# Altium PCB Drain_board.PcbDoc
Units mm, origin at the board's own origin, x right, y up, seen from the top; angles counter-clockwise.
Board outline 35.5 x 49.5 mm, 2 copper layers (Top Layer, Bottom Layer); 20 components, 16 nets, 122 pads, 32 vias.
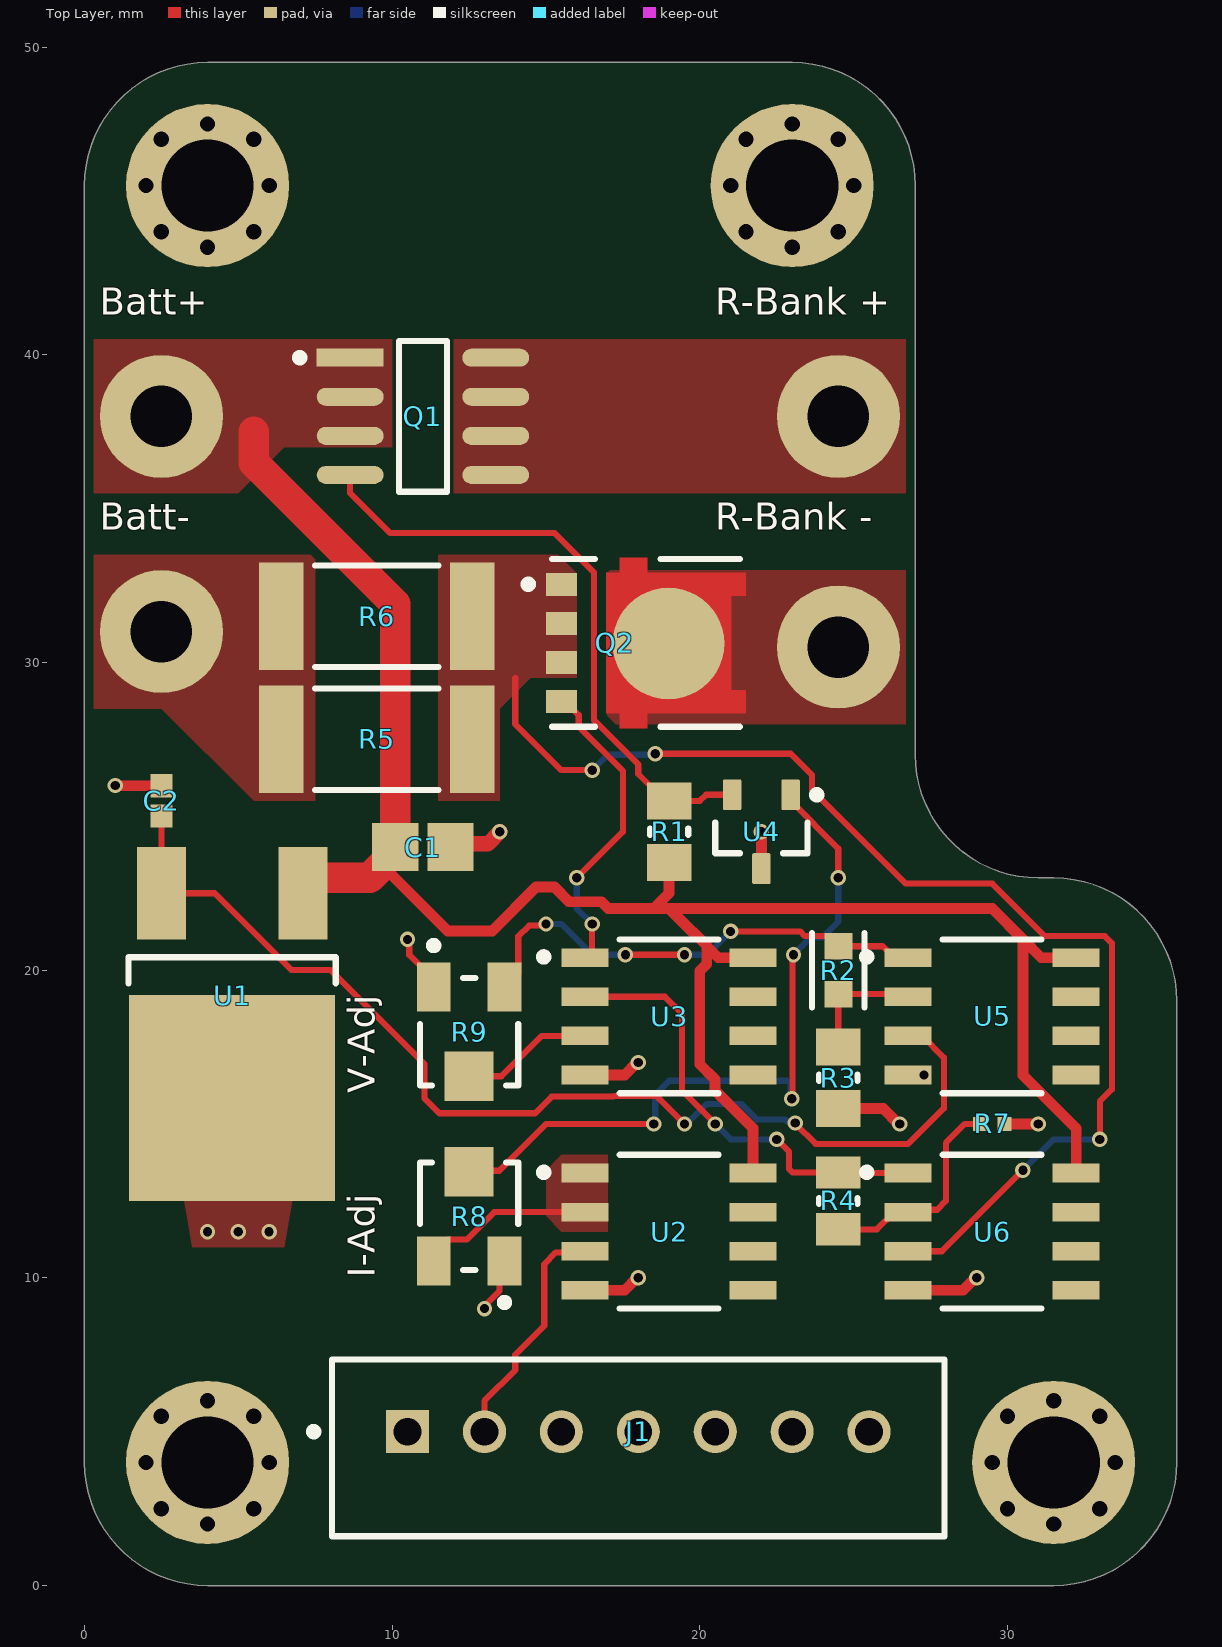
[diagram p0: Top Layer view]
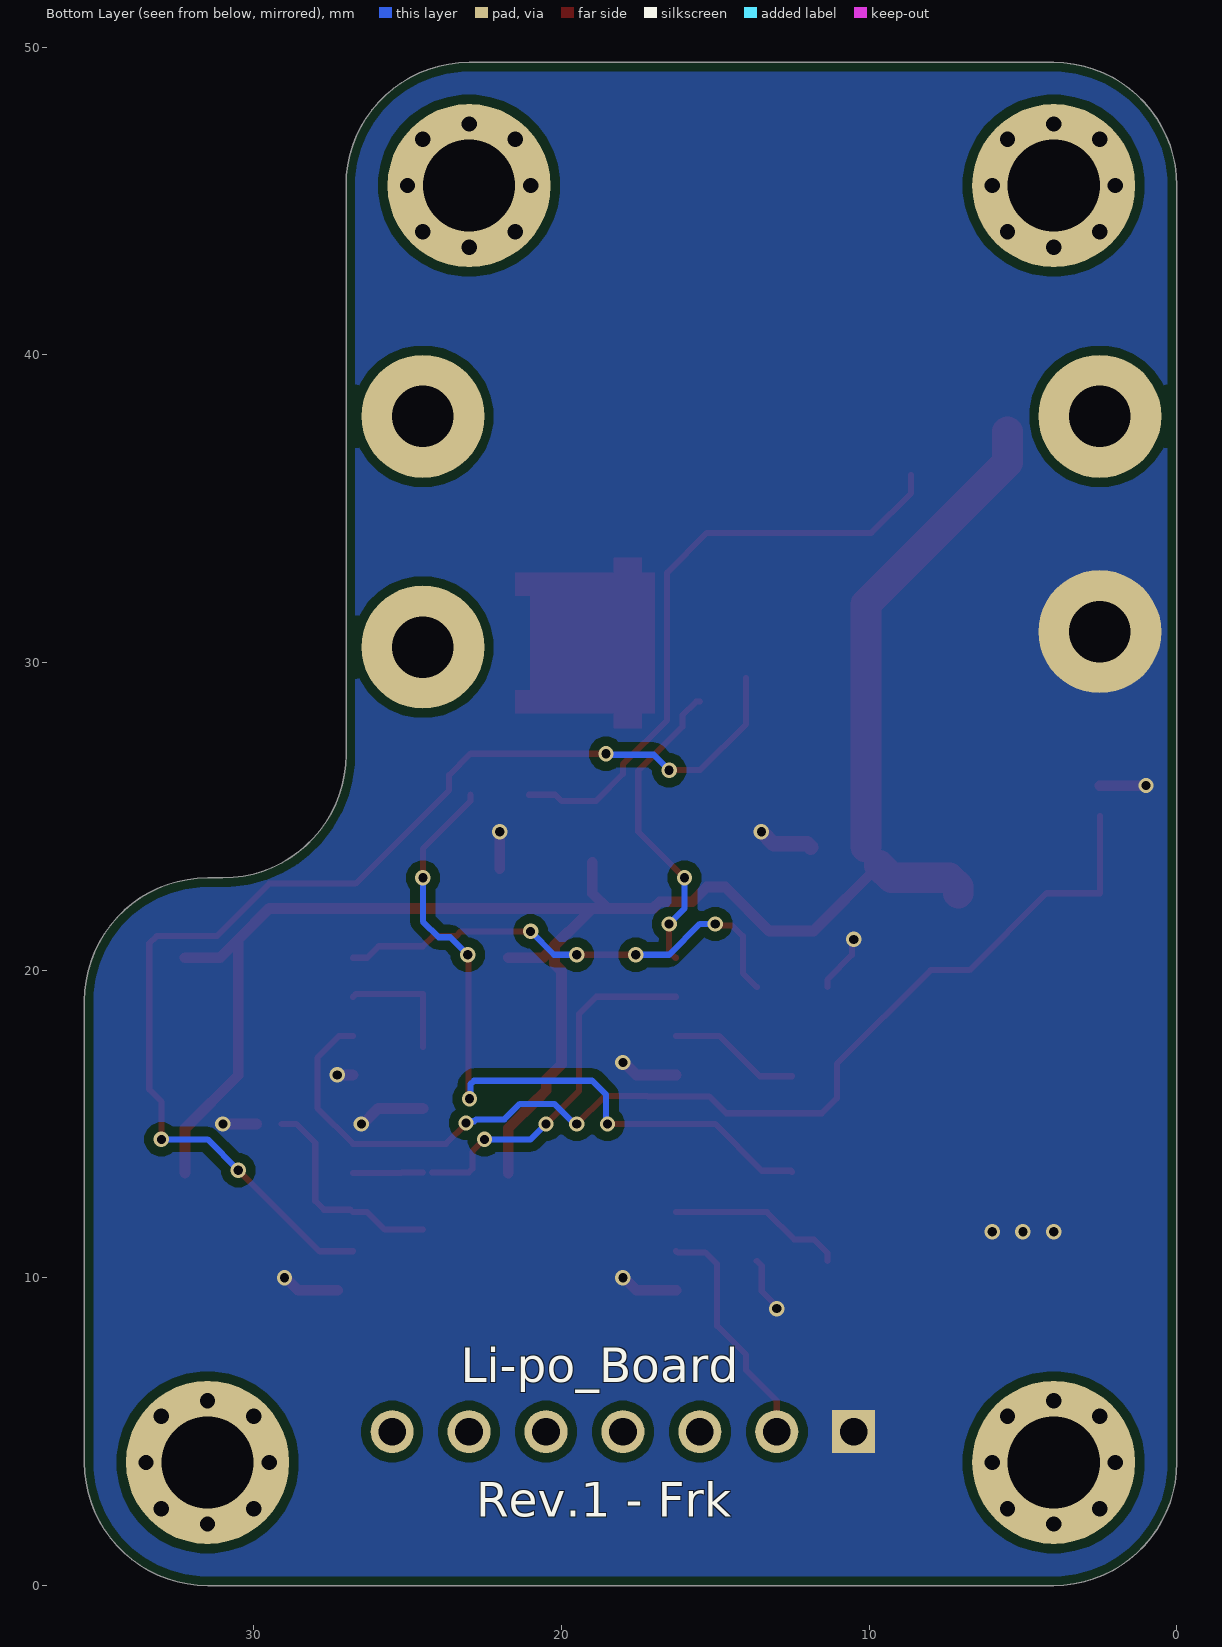
[diagram p1: Bottom Layer view, seen from below]
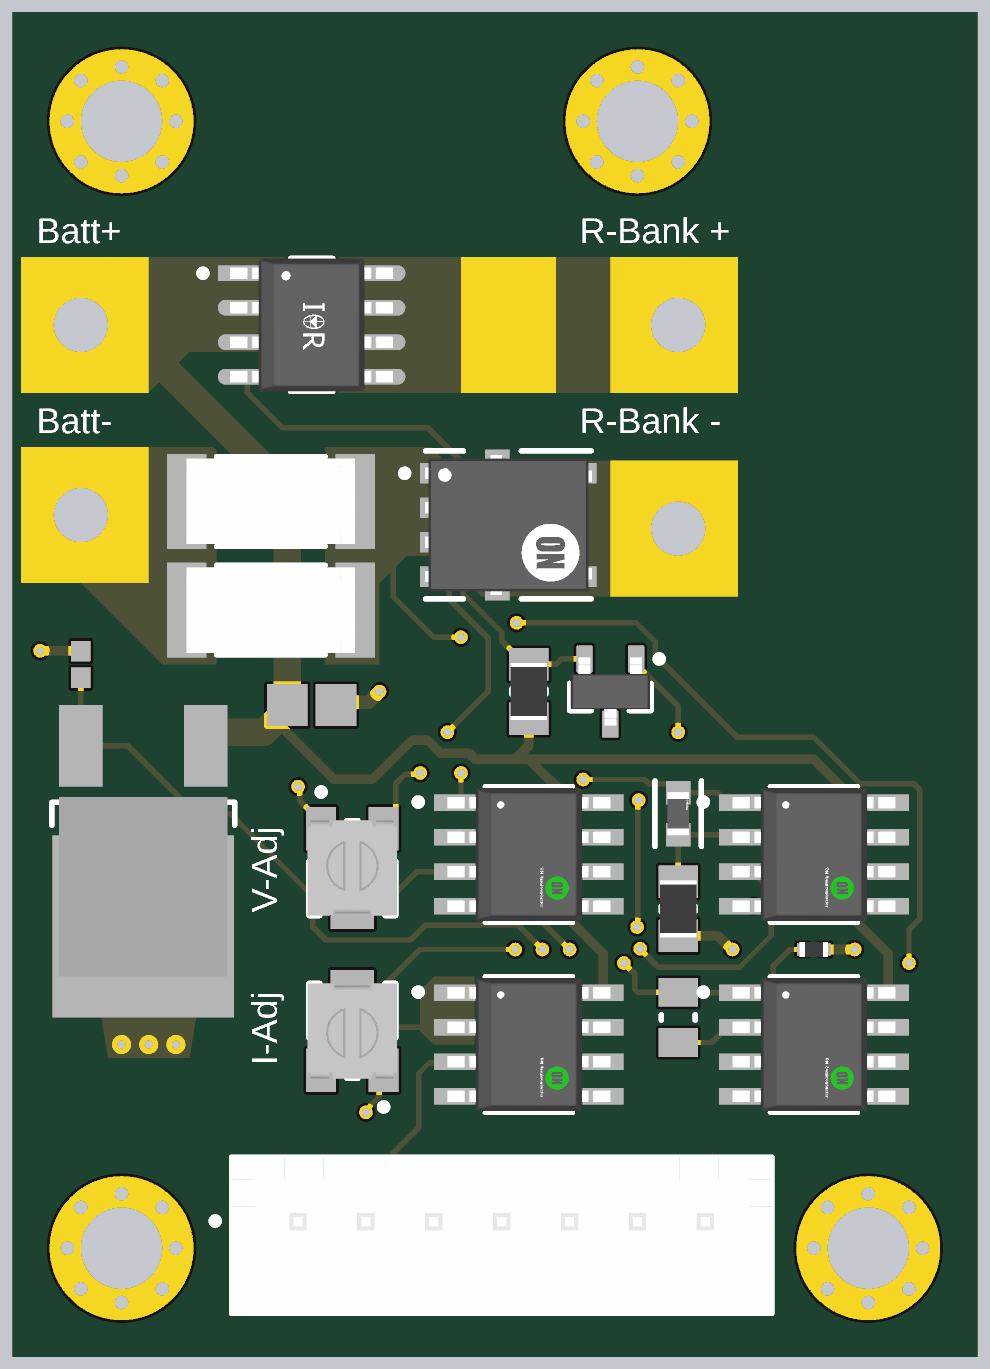
[diagram p2: 3D render of the assembled board from above, using the file's embedded part models]

## Layer stack, top to bottom
Top Solder: solder mask 0.0102, Solder Resist, Dk 3.5
Top Layer: signal copper 0.035
Dielectric 1: dielectric 0.32, FR-4, Dk 4.8
Bottom Layer: signal copper 0.035
Bottom Solder: solder mask 0.0102, Solder Resist, Dk 3.5

## Board outline
0,4 0,45.5 cw(c4,45.5) 4,49.5 23,49.5 cw(c23,45.5) 27,45.5 27,27 ccw(c31,27) 31,23 31.5,23 cw(c31.5,19) 35.5,19 35.5,4 cw(c31.5,4) 31.5,0 4,0 cw(c4,4)

## Design rules (kind name [scope] priority, off if disabled: settings)
BoardOutlineClearance [All] p1: gap=0.3 ignorepadtopadclearanceinfootprint=FALSE
Clearance [All] p1: gap=0.3 ignorepadtopadclearanceinfootprint=TRUE
HoleSize [All] p1: absolutevalues=TRUE maxlimit=6.2 minlimit=0.15 maxpercent=80.000 minpercent=20.000
PlaneConnect [All] p1: planeconnectstyle=Direct reliefexpansion=0.508 reliefentries=4 reliefconductorwidth=0.254 reliefairgap=0.254
PolygonConnect [All] p1: connectstyle=Direct reliefconductorwidth=0.254 reliefentries=4 polygonreliefangle="90 Angle" airgapwidth=0.254
RoutingVias [All] p1: holewidth=0.3 width=0.5 viastyle="Through Hole" minholewidth=0.3 minwidth=0.5 maxholewidth=1 maxwidth=2
SolderMaskExpansion [All] p1: expansion=0.102 istentingtop=FALSE
SupplyNets "Schematic Supply Nets_2" [InNet('GND')] p1: voltage=0.000
SupplyNets "Schematic Supply Nets_1" [InNet('+5')] p2: voltage=0.000
SupplyNets "Schematic Supply Nets" [InNet('VCC')] p3: voltage=0.000
Width [All] p1: maxlimit=1 minlimit=0.2 preferedwidth=0.35
28 further rules are at their usual default settings.

## Components (designator, comment, footprint, x,y, rotation, side; value= is the part's Value field where it differs from the comment)
C1 "C0805C225K9PACTU" CAPC2013X145X50ML20T25 11,24 r180 top
C2 "CL05B104KO5NNNC" CAPC1050X55X23ML05T13 2.5,25.5 r270 top
J1 "B7B-XH-A(LF)(SN)" FP-B7B-XH-A_LF_SN-MFG 18,4.475 r180 top
Q1 "IRF7416TRPBF" FP-PG-DSO-8-IPC_B 11,38 r0 top
Q2 "NTMFS5C430NT1G" FP-488AA-MFG 18.247,30.635 r270 top
R1 "RC0805FR-071KL" RESC2013X60X35ML10T20 19,24.5 r270 top
R2 "AC0603FR-071KL" FP-AC0603-IPC_B 24.5,20 r90 top
R3 "RC0805FR-071KL" RESC2013X60X35ML10T20 24.5,16.5 r90 top
R4 "12k Ohm 0805" RESC2013X50X30NL20T20 24.5,12.5 r270 top
R5 "0.03ohm - 2512" FP-CRCW2512-e3-MFG 9.5,27.5 r0 top
R6 "0.03ohm - 2512" FP-CRCW2512-e3-MFG 9.5,31.5 r0 top
R7 "82 ohm" RESC1005X40X25LL05T05 29.5,15 r180 top
R8 "3313J-1-203E" BOUR-3313J-1_V 12.5,12 r90 top
R9 "3313J-1-203E" BOUR-3313J-1_V 12.5,18 r270 top
U1 "L78M05ABDT-TR" FP-L78M05ABDT-TR-MFG 4.8,17.307 r180 top
U2 "NCS20072DR2G" FP-751-07-MFG 19,11.5 r0 top
U3 "NCS20072DR2G" FP-751-07-MFG 19,18.5 r0 top
U4 "TL432BQDBZR" DBZ0003A_N 22,24.5 r270 top
U5 "NCS20072DR2G" FP-751-07-MFG 29.5,18.5 r0 top
U6 "NCS20072DR2G" FP-751-07-MFG 29.5,11.5 r0 top

## Footprints (in the part's own frame and the unit in brackets; to place one, negate y for a bottom-side part, rotate by r counter-clockwise, add the part's x,y. Pads: shape width x height; smd on the part's side, far side on the other; paste and mask are expansions set on the pad)
BOUR-3313J-1_V [mm] "SMD, 3-Leads, Body 3.5x3.2mm, Pitch 1.15mm"
  rect 1.6x1.1 smd paste+0: 1(-1.45,-1.15) 3(-1.45,1.15)
  rect 1.6x1.6 smd paste+0: 2(1.45,0)
  silkscreen extent -2.92,-1.6 1.75,1.6, body extent -1.75,-1.65 1.75,1.65, height 2.11
CAPC1050X55X23ML05T13 [mm] "Chip Capacitor, 2-Leads, Body 1.05x0.55mm, IPC Low Density"
  rect 0.76x0.72 smd: 1(-0.49,0) 2(0.49,0)
  body extent -0.53,-0.28 0.53,0.27, height 0.55
CAPC2013X145X50ML20T25 [mm] "Chip Capacitor, 2-Leads, Body 2.00x1.25mm, IPC Low Density"
  rect 1.5x1.55 smd: 1(-0.9,0) 2(0.9,0)
  body extent -1.1,-0.72 1.1,0.72, height 1.45
DBZ0003A_N [mm] "SOT23, 3-Leads, Body 3.04x1.4mm, Pitch 0.95mm, IPC Medium Density"
  rrect17% 1x0.6 smd: 1(-1.2,0.95) 2(-1.2,-0.95) 3(1.2,0)
  silkscreen extent -1.32,-1.5 0.7,1.93, body extent -1.26,-1.46 1.26,1.46, height 0.96
FP-488AA-MFG [mm]
  rect 0.75x1 smd paste+0 mask+0: 1(-1.905,-2.748) 2(-0.635,-2.748) 3(0.635,-2.748) 4(1.905,-2.748)
  round 3.631 smd paste+0 mask+0: 5-6(0.021,0.735)
  Top Layer region: -2.28,-1.282 -2.28,-0.857 -2.775,-0.857 -2.775,0.048 -2.28,0.048 -2.28,3.247 -1.53,3.247 -1.53,2.772 1.53,2.772 1.53,3.247 2.28,3.247 2.28,0.048 2.775,0.048 2.775,-0.857 2.28,-0.857 2.28,-1.282
  silkscreen extent -2.73,-3.95 2.73,3.05, body extent -2.88,-3.35 2.88,3.35, height 0.25
FP-751-07-MFG [mil]
  rect 60x24 smd paste+0 mask+0: 1(-107.5,75) 2(-107.5,25) 3(-107.5,-25) 4(-107.5,-75) 5(107.5,-75) 6(107.5,-25) 7(107.5,25) 8(107.5,75)
  silkscreen extent -165,-98 63,98, body extent -141,-108 141,108, height 10
FP-AC0603-IPC_B [mm]
  rect 0.859x0.912 smd paste+0 mask+0: 1(-0.777,0) 2(0.777,0)
  silkscreen extent -1.21,-0.86 1.21,0.86, body extent -1.46,-0.71 1.46,0.71, height 0.25
FP-B7B-XH-A_LF_SN-MFG [mm]
  rect 1.4x1.4 hole 0.9 paste-2539.97 mask+0: 1(7.5,-0.525)
  round 1.4 hole 0.9 paste-2539.97 mask+0: 2(5,-0.525) 3(2.5,-0.525) 4(0,-0.525) 5(-2.5,-0.525) 6(-5,-0.525) 7(-7.5,-0.525)
  silkscreen extent -9.95,-2.88 10.67,2.88, body extent -10.05,-2.98 10.05,2.98, height 0.25
FP-CRCW2512-e3-MFG [mm]
  rect 1.45x3.5 smd paste+0 mask+0: 1(-3.1,0) 2(3.1,0)
  silkscreen extent -2,-1.65 2,1.65, body extent -3.93,-1.85 3.93,1.85, height 0.25
FP-L78M05ABDT-TR-MFG [mm]
  rect 1.6x3 smd paste+0 mask+0: 1(-2.3,-5.193) 3(2.3,-5.193)
  rect 6.7x6.7 smd paste+0 mask+0: 4(0,1.458)
  silkscreen extent -3.36,-3.11 3.36,-2.27, body extent -3.46,-6.79 3.46,4.91, height 0.25
FP-PG-DSO-8-IPC_B [mm]
  rect 2.174x0.583 smd paste+0 mask+0: 1(-2.366,1.905)
  rrect100% 2.174x0.583 smd paste+0 mask+0: 2(-2.366,0.635) 3(-2.366,-0.635) 4(-2.366,-1.905) 5(2.366,-1.905) 6(2.366,-0.635) 7(2.366,0.635) 8(2.366,1.905)
  silkscreen extent -4.13,-2.45 0.78,2.45, body extent -3.7,-2.7 3.7,2.7, height 0.25
RESC1005X40X25LL05T05 [mm] "Chip Resistor, 2-Leads, Body 1.05x0.55mm, IPC High Density"
  rect 0.45x0.45 smd: 1(-0.4,0) 2(0.4,0)
  body extent -0.53,-0.28 0.53,0.28, height 0.4
RESC2013X50X30NL20T20 [mm] "Chip Resistor, 2-Leads, Body 2.00x1.25mm, IPC Medium Density"
  rect 1.05x1.45 smd: 1(-0.925,0) 2(0.925,0)
  silkscreen extent -0.1,-0.63 0.1,0.63, body extent -1.1,-0.72 1.1,0.72, height 0.5
RESC2013X60X35ML10T20 [mm] "Chip Resistor, 2-Leads, Body 2.1x1.35mm, IPC Low Density"
  rect 1.2x1.45 smd: 1(-1,0) 2(1,0)
  silkscreen extent -0.1,-0.63 0.1,0.63, body extent -1.05,-0.68 1.05,0.67, height 0.6

## Part data
C1: library part CMP-1036-04819-2, Manufacturer=Kemet, Part Number=C0805C225K9PACTU
C2: library part CMP-2000-05439-1, "Chip Capacitor, 100 nF, +/- 10%, 16 V, -55 to 125 degC, 0402 (1005 Metric), RoHS, Tape and Reel", Capacitance=100000pF, Case Size/Dimension=0402, Dielectric=X7R, Manufacturer="Samsung Electro-Mechanics", Rated Voltage=16V, Tolerance (%)=±10%, Datasheet URL=https://datasheet.ciiva.com/29198/458718-da-01-en-vs-kondensator-0402-29198423.pdf, Datasheet Version=Nov-10, Manufacturer URL=http://www.samsungsem.com/global/index.jsp
J1: library part CMP-17439-000323-2, "CONN HEADER VERT 7POS 2.5MM", Color=Natural, Contact Resistance=20mR, Current Rating=3A, Flammability Rating="UL94 V-0", Housing Color=White, Insulation Resistance=1GR, Max Operating Temperature=85°C, Max Voltage Rating (AC)=250V, Min Operating Temperature=-25°C, Connector Type=Header, Contact Finish - Mating=TIN, Contact Material=Brass, Contact Plating=Tin, Contact Shape=Square, Contact Type="Male Pin", Depth=5.75mm, Fastening Type=Detent, Housing Material=Polyamide, Insulation Color=Natural, Insulation Material=Nylon, Lead Free="Lead Free", Lead Pitch=2.5mm, Length=19.9mm, Mated Stacking Heights=9.8mm, Max Current Rating=3A, Mount="Through Hole", Number of Contacts=7, Number of Positions=7, Number of Rows=1, Orientation=Straight, Packaging=Bulk, Pitch=2.5mm, REACH SVHC="No SVHC", Series=XH, Termination=Solder, Voltage Rating=250V, Voltage Rating (AC)=250V, Wire/Cable Gauge=22AWG
Q1: library part CMP-32901-000322-1, "MOSFET P-CH 30V 10A 8-SOIC", Case/Package=SO, Continuous Drain Current (ID)=10A, Drain to Source Breakdown Voltage=-30V, Drain to Source Resistance=35mR, Gate to Source Voltage (Vgs)=20V, Input Capacitance=1.7nF, Max Operating Temperature=150°C, Max Power Dissipation=2.5W, Min Operating Temperature=-55°C, Threshold Voltage=-20V, Contact Plating=Tin, Drain to Source Voltage (Vdss)=-30V, Halogen Free="Halogen Free", Height=0.059inch, Lead Free="Lead Free", Length=0.196inch, Max Dual Supply Voltage=-30V, Mount="Surface Mount", Number of Pins=8, Packaging="Tape and Reel", Power Dissipation=2.5W, Rds On Max=20mR, REACH SVHC="No SVHC", Rise Time=49ns, RoHS Compliant=Yes, Turn-Off Delay Time=59ns, Turn-On Delay Time=18ns, Width=0.157inch
Q2: library part CMP-00278-75099839-1, "NTMFS5C430NT1G T6-D3F 40V Nfet/Reel Rohs Compliant: Yes", Drain to Source Resistance=1.4mΩ, Manufacturer Lifecycle Status=ACTIVE, Lead Free="Lead Free", Lifecycle Status=Production, NexarPartId=75099839, RoHS=Compliant, Schedule B="8541290080, 8541290080"
R1 R3: library part CMP-2100-03671-1, "Chip Resistor, 1 KOhm, +/- 1%, 125 mW, -55 to 155 degC, 0805 (2012 Metric), RoHS, Tape and Reel", Case Code (Imperial)=0805, Case Code (Metric)=2012, Manufacturer=Yageo, Max Operating Temperature=155degC, Max Power Dissipation=125mW, Min Operating Temperature=-55degC, Package Description="2-Pin Surface Mounted Device, Body 2 x 1.25 mm", Package Quantity=1, Resistance=1KOhm, Temperature Coefficient=100ppm/degreesC, Tolerance=1%, Voltage Rating=150V, Case/Package=0805, Composition=ThickFilm, Datasheet URL=http://www.yageo.com/NewPortal/yageodocoutput?fileName=/pdf/R-Chip/PYu-RC_Group_51_RoHS_L_5.pdf, Datasheet Version="Rev. 5, 10/2016", Depth=1.25mm, Height=0.024inch, Lead Free=LeadFree, Length=0.079inch, Manufacturer URL=http://www.yageo.com/, Military Standard=Not, Number of Pins=2, Number of Terminations=2, Package Reference=0805, Packaging=TapeandReel, Power Rating=125mW, REACH SVHC=Unknown, RoHSCompliant=true, Termination=SMD/SMT, Voltage Rating (DC)=150V, Width=0.049inch
R2: library part CMP-2000-04828-3, "RES 1kΩ 1.00% 0.1W 0603", Case Code (Imperial)=0603, Case Code (Metric)=1608, Max Operating Temperature=155°C, Max Power Dissipation=100mW, Min Operating Temperature=-55°C, Package Quantity=1, Ratings=AEC-Q200, Resistance=1kR, Resistor Type="Thick Film", Temperature Coefficient=100ppm/°C, Tolerance=1%, Voltage Rating=50V, Case/Package=0603, Construction=Rectangular, Depth=0.8mm, Features="Moisture Resistant", Height=0.022inch, Lead Free="Lead Free", Length=0.063inch, Military Standard=Not, Number of Terminations=2, Packaging="Tape and Reel", Power Rating=100mW, RoHS Compliant=Yes, Series=AC, Size Code=0603, Termination=SMD/SMT, Width=0.031inch
R4: library part CMP-2001-03792-1, Manufacturer="Vishay Dale", Part Number=CRCW08052R00JNEA
R5 R6: library part CMP-02407-004199-1, "RES Thick Film, 100kΩ, 1%, 1W, 100ppm/°C, 2512", Case Code (Imperial)=2512, Case Code (Metric)=6432, Max Operating Temperature=155°C, Max Power Dissipation=1W, Min Operating Temperature=-55°C, Package Quantity=2000, Resistance=100kR, Temperature Coefficient=100ppm/°C, Tolerance=1%, Voltage Rating=500V, Case/Package=2512, Composition="Thick Film", Contact Plating=Tin, Depth=3.15mm, Features="Automotive AEC-Q200", Height=0.6mm, Lead Free="Lead Free", Length=6.3mm, Military Standard=Not, Number of Pins=2, Number of Terminations=2, Packaging="Tape and Reel", Power Rating=1W, Radiation Hardening=No, Termination=SMD/SMT, Voltage Rating (DC)=500V, Weight=0.001429oz, Width=3.15mm
R7: library part CMP-2000-07451-1, "Chip Resistor, 0 Ohm, 0.1 W, -55 to 155 degC, 0402 (1005 Metric), RoHS, Tape and Reel", Case Code (Imperial)=0402, Case Code (Metric)=1005, Manufacturer=Panasonic, Max Operating Temperature=155degC, Max Power Dissipation=100mW, Min Operating Temperature=-55degC, Package Description="2-Pin Surface Mount Device, Body 1 x 0.5 mm", Package Quantity=1, Package Reference=402, Resistance=0mOhm, Temperature Coefficient=600ppm/��C, Tolerance=5%, Voltage Rating=50V, Case/Package=0402, Composition=ThickFilm, Contact Plating=Tin, Datasheet URL=https://industrial.panasonic.com/cdbs/www-data/pdf/RDA0000/AOA0000C301.pdf, Datasheet Version=03/2015, Depth=0.5mm, Height=0.35mm, Lead Free=LeadFree, Length=1mm, Manufacturer URL=http://www.panasonic.com/, Military Standard=Not, Mount=SurfaceMount, Mounting Technology=SurfaceMount, Number of Terminations=2, Packaging=TapeandReel, Power Rating=100mW, Radiation Hardening=No, REACH SVHC=NoSVHC, RoHSCompliant=True, Termination=SMD/SMT, Voltage Rating (DC)=50V, Width=0.02inch
R8 R9: library part CMP-2000-05586-1, "3 mm Trimpot(R) Trimming Potentiometer, 20 KOhm, +/- 20%, 0.125 W, -55 to 125 degC, 3-Pin SMD, RoHS, Tape and Reel", Dielectric Strength=500VAC, Insulation Resistance=100Megohms(Min.)@500VDC, Manufacturer=Bourns, Package Description="3-Pin Surface Mount Device, Body 3.5 x 3.2 mm, Pitch 1.15 mm", Package Reference=3313J-1, Power, Rating=0.125W, Resistance=20Kilohms, Resistance, Insulation=100Megohms, Temperature Coefficient=±100ppm/°C, Temperature, Operating, Maximum=+125°C, Temperature, Operating, Minimum=-55°C, Tolerance=±20%, Angle, Mechanical=250°, Brand/Series=Trimpot®3313-SealedSeries, Datasheet URL=http://www.bourns.com/docs/Product-Datasheets/3313.pdf, Datasheet Version=05/2016, Dimensions="0.126\"Lx0.138\"Wx0.087\"H", Load Life=1000hr@0.125W,70°C, Manufacturer URL=http://www.bourns.com/, Material, Element=Cermet, Mounting Technology=SurfaceMount, Mounting Type=SurfaceMount, Number of Turns=1, Resolution=Infinite, Rotational Life=100Cycles, Standards=RoHSCompliant, Termination=SMD, Torque=50g-cm, Type=Trimmer
U1: library part CMP-0244-00177-2, "IC REG LINEAR 5V 500MA DPAK", Case/Package=TO-252, Dropout Voltage=2V, Max Input Voltage=35V, Max Operating Temperature=125°C, Max Output Current=500mA, Min Input Voltage=10V, Min Operating Temperature=-40°C, Min Output Voltage=5V, Output Voltage Accuracy=2%, Package Quantity=1, Power Supply Rejection Ratio (PSRR)=62dB, Quiescent Current=6mA, Tolerance=4%, Accuracy=2%, Contact Plating=Tin, Height=2.4mm, Lead Free="Lead Free", Length=6.6mm, Mount="Surface Mount", Nominal Output Voltage=5V, Number Of Outputs=1, Number of Pins=3, Number of Regulators=1, Output Current=500mA, Output Type=Fixed, Output Voltage=5V, Packaging="Tape and Reel", Polarity=Positive, Radiation Hardening=No, REACH SVHC="No SVHC", Weight=0.01lb, Width=6.2mm
U2 U3 U5 U6: library part CMP-07106-000003-1, "IC OPAMP 3MHZ RRO DUAL 8SOIC", Ambient Temperature Range High=+125°C, Ambient Temperature Range Low=-40°C, Input Bias Current=0.000005uA, Input Offset Voltage=1.3mV, Manufacturer="ON Semiconductor", Max Dual Supply Voltage=18V, Max Junction Temp=+150°C, Max Supply Voltage=36V, Min Dual Supply Voltage=1.35V, Min Supply Voltage=2.7V, Nominal Supply Current=405-465uA, Output Current Per Channel=465uA, Package=751-07, Temperature="-40°C to +125°C", Voltage Gain=118-120dB, Automotive=No, Bandwidth=3MHz, Category=IC, ComponentLink2Description=Datasheet, ComponentLink2URL=http://www.onsemi.com/pub/Collateral/NCS20071-D.PDF, Device Class L1="Integrated Circuits (ICs)", Device Class L2="Linear ICs", Device Class L3="Amplifiers - Op Amps", Digikey Description="IC OPAMP 3MHZ RRO DUAL 8SOIC", Footprint Url=http://www.onsemi.com/pub/Collateral/751-07.PDF, Gain Bandwidth=3MHz, Height=1.75mm, Lead Free=Yes, Manufacturer Part Number=NCS20072DR2G, Mouser Description="Operational Amplifiers - Op Amps R2R DUAL AMPLIFIER", Number of Channels=2, Octopart=https://octopart.com/ncs20072dr2g-on+semiconductor-56676507, RoHS=TRUE, Standoff Height=0.1mm, Temperature Range High=+125°C, Temperature Range Low=-40°C
U4: library part CMP-0366-00802-2, "Adjustable Precision Shunt Regulator, 34 ppm / degC, 100 mA, -40 to 125 degC, 3-pin SOT-23 (DBZ), Green (RoHS & no Sb/Br)", Manufacturer="Texas Instruments", Rating=Catalog, Temp Coeff(Max)(ppm/ degree C)=92, Temp Coeff(Typ)(ppm/ degree C)=34, Code_JEDEC=TO-236, ComponentLink1Description="Manufacturer URL", ComponentLink1URL=http://www.ti.com/, ComponentLink2Description=Datasheet, ComponentLink2URL=http://www.ti.com/general/docs/lit/getliterature.tsp?genericPartNumber=TL432B&fileType=pdf, ComponentLink3Description="Package Specification", ComponentLink3URL=http://www.ti.com/litv/pdf/mpds108a, DatasheetVersion=SLVS543M, Eco-Plan="Green (RoHS & no Sb/Br)", Initial Accuracy @ 25/deg C(%)=0.5, Iout/Iz(Max)(mA)=100, Min Iz for Regulation(uA)=600, Mounting Technology="Surface Mount", PackageDescription="3-Pin Plastic Small Outline, Body 2.92 x 1.3 mm, Pitch 0.95 mm", PackageReference=DBZ0003A, PackageVersion=4203227/B, PartNumber=TL432BQDBZR, SubFamily="Shunt Voltage Reference", VO Adj(Max)(V)=36, VO Adj(Min)(V)=2.495

## Free pads (board coordinates)
  round 4 hole 2: 2(2.5,31) 2(2.5,38) 2(24.5,30.5) 2(24.5,38)
  round 5.3 hole 3: h(4,4) h(4,45.5) h(23,45.5) h(31.5,4)
  round 1.3 hole 0.5: o(2,4) o(2,45.5) o(4,2) o(4,6) o(4,43.5) o(4,47.5) o(6,4) o(6,45.5) o(21,45.5) o(23,43.5) o(23,47.5) o(25,45.5) o(29.5,4) o(31.5,2) o(31.5,6) o(33.5,4)
  round 1 hole 0.5: o(2.5,2.5) o(2.5,5.5) o(2.5,44) o(2.5,47) o(5.5,2.5) o(5.5,5.5) o(5.5,44) o(5.5,47) o(21.5,44) o(21.5,47) o(24.5,44) o(24.5,47) o(30,2.5) o(30,5.5) o(33,2.5) o(33,5.5)

## Via types
v1: diameter 0.5, hole 0.3, Top Layer to Bottom Layer, 32 vias

## Nets (pads, with @x,y where several pads share a name; then routed paths per layer and width w, separated by ;. In a path a pad name is that pad's centre, name@x,y a point inside that pad or via, vN(x,y) a via of type N, cw(c..) or ccw(c..) an arc to the next point about the centre after c; other vN are vias at no path point)
+5: C2.2 U1.3 U5.3 | length 36.6
  Top Layer w0.2: C2.2 U1.3 4.234,22.5 6.734,20 8,20 11.046,16.954 11.046,15.838 11.534,15.35 14.643,15.35 15.183,15.89 17.197,15.89 17.214,15.907 18.593,15.907 v1(19.5,15) ; v1(23.099,15.031) 23.099,15.011 23.759,14.35 26.769,14.35 27.931,15.512 27.931,17.16 27.227,17.865 U5.3
  Bottom Layer w0.2: v1(19.5,15) 19.581,15 20.231,15.65 21.35,15.65 21.85,15.15 22.769,15.15 22.831,15.088 23.041,15.088 v1(23.099,15.031)
GND: C1.1 C2.1 J1.1 pad.2@2.5,31 R3.1 R5.1 R6.1 R7.1 R8.1 R9.1 U1.4 U2.4 U3.4 U4.3 U5.4 U6.4 | length 17.7
  Top Layer w0.2: v1(10.5,21) 10.557,20.943 10.557,20.493 11.35,19.7 R9.1 ; v1(13,9) 13,9.081 13.486,9.567 13.486,10.386 R8.1
  Top Layer w0.35: v1(1,26) 1.005,25.995 2.495,25.995 C2.1 ; U2.4 17.557,9.595 17.962,10 v1(18,10) ; U3.4 17.556,16.595 17.961,17 v1(18,17) ; U4.3 v1(22,24.5) ; R3.1 25.959,15.5 26.459,15 v1(26.5,15) ; U5.4 v1(27.281,16.595) ; U6.4@27.27,9.595 28.556,9.595 28.961,10 v1(29,10) ; R7.1 v1(31,15)
  Top Layer w0.5: C1.1 12.007,24.107 13.107,24.107 v1(13.5,24.5)
  other v1: 4,11.5 5,11.5 6,11.5
NetJ1_2: J1.2 U2.3 | length 7.7
  Top Layer w0.2: J1.2 13,6 14,7 14,7.5 14.941,8.441 14.941,10.441 15.325,10.825 16.229,10.825 U2.3
NetQ1_4: Q1.4 R1.1 U4.2 | length 20.2
  Top Layer w0.2: Q1.4 8.634,35.503 9.928,34.209 15.271,34.209 16.565,32.916 16.565,28.497 16.565,28.119 18,26.684 18,26.375 18.875,25.5 20,25.5 20.2,25.7 U4.2
NetQ1_5: pad.2@24.5,38 Q1.5 Q1.6 Q1.7 Q1.8
NetQ2_1: Q2.1 Q2.2 Q2.3 R5.2 R6.2 U6.3 | length 38.8
  Top Layer w0.2: 14,29.5 14,28 15.5,26.5 v1(16.5,26.5) ; v1(18.55,27.031) 22.954,27.031 23.65,26.336 23.65,25.85 26.688,22.812 29.501,22.812 31.203,21.11 33.158,21.11 33.392,20.875 33.392,16.125 33,15.732 v1(33,14.5) ; U6.3 27.865,10.865 v1(30.5,13.5)
  Bottom Layer w0.2: v1(16.5,26.5) 17,27 18.518,27 v1(18.55,27.031) ; v1(30.5,13.5) 31.5,14.5 v1(33,14.5)
NetQ2_4: Q2.4 U3.1 | length 10.2
  Top Layer w0.2: Q2.4 15.625,28.73 16.065,28.29 16.065,27.912 17.5,26.477 17.5,24.5 v1(16,23) ; U3.1 16.295,20.405 16.5,20.61 v1(16.5,21.5)
  Bottom Layer w0.2: v1(16,23) 16,22 v1(16.5,21.5)
NetQ2_5-6: pad.2@24.5,30.5 Q2.5-6
NetR2_1: R2.1 R3.2 U5.2 | length 4
  Top Layer w0.2: R3.2 R2.1 26.681,19.223 U5.2
NetR2_2: R2.2 R9.3 U5.1 | length 15.8
  Top Layer w0.2: R9.3 14.1,19.9 14.1,21.1 14.45,21.45 14.95,21.45 v1(15,21.5) ; v1(17.581,20.5) v1(19.5,20.5) ; v1(21,21.26) 23.263,21.26 23.417,21.106 24.171,21.106 R2.2 25.941,20.777 26.312,20.405 U5.1
  Bottom Layer w0.2: v1(15,21.5) 15.5,21.5 16.5,20.5 v1(17.581,20.5) ; v1(19.5,20.5) 20.24,20.5 v1(21,21.26)
NetR4_1: R4.1 U3.2 U6.1 | length 14.4
  Top Layer w0.2: U3.2 18.865,19.135 19.425,18.575 19.425,16.075 v1(20.5,15) ; v1(22.5,14.5) 22.893,14.108 22.893,13.542 23.01,13.425 R4.1@24.2,13.425 ; R4.1 25.2,13.425 25.22,13.405 U6.1
  Bottom Layer w0.2: v1(20.5,15) 21,14.5 v1(22.5,14.5)
NetR4_2: R4.2 R7.2 U6.2 | length 7
  Top Layer w0.2: R4.2 25.752,11.575 26.312,12.135 U6.2 ; U6.2@26.849,12.214 27.714,12.214 28,12.5 28,14.383 28.617,15 R7.2
NetR8_2: R8.2 U4.1 | length 24.1
  Top Layer w0.2: R8.2 12.533,13.483 13.483,13.483 15,15 v1(18.5,15) ; U4.1 22.95,25.5 24.5,23.95 v1(24.5,23) ; v1(22.986,15.823) 23.014,15.851 23.014,20.472 v1(23.042,20.5)
  Bottom Layer w0.2: v1(18.5,15) 18.55,15.05 18.55,15.958 19,16.408 22.839,16.408 22.956,16.291 22.956,15.853 v1(22.986,15.823) ; v1(23.042,20.5) 23.612,21.069 23.988,21.069 24.5,21.581 v1(24.5,23)
NetR8_3: R8.3 U2.1 U2.2 | length 5.7
  Top Layer w0.2: R8.3 11.35,10.8 11.8,11.25 12.434,11.25 13.319,12.135 U2.2
NetR9_2: R9.2 U3.3 | length 4.3
  Top Layer w0.2: R9.2 13.55,16.55 14.865,17.865 U3.3
VCC: C1.2 pad.2@2.5,38 Q1.1 Q1.2 Q1.3 R1.2 U1.1 U2.8 U3.8 U5.8 U6.8 | length 66
  Top Layer w0.35: C1.2 9.664,23.564 9.514,23.564 9.59,23.489 9.672,23.407 11.804,21.275 13.25,21.275 14.674,22.7 15.275,22.7 15.75,22.225 16.8,22.225 17.025,22 18.5,22 ; R1.2 19,22.5 18.5,22 ; 20.225,20.775 20.595,20.405 U3.8 ; U2.8 21.731,14.859 20.774,15.815 20.772,15.815 20.493,16.093 20.493,16.445 20,16.939 20,19.975 20.225,20.2 20.225,20.8 19.8,21.225 19.775,21.225 19,22 ; U6.8 32.23,14.856 30.5,16.587 30.5,21 ; U5.8 31.095,20.405 30.5,21 ; 18.5,22 19,22 ; 19,22 29.5,22 30.5,21
  Top Layer w1: 5.5,37.5 5.5,36.5 10.1,31.9 C1.2 ; U1.1 7.1,22.7 7.4,23 9.264,23 C1.2@9.672,23.407
pads on no net: J1.3 J1.4 J1.5 J1.6 J1.7 U2.5 U2.6 U2.7 U3.5 U3.6 U3.7 U5.5 U5.6 U5.7 U6.5 U6.6 U6.7

## Polygon pours and split planes (outlines as drawn)
NetQ1_5 on Top Solder "Gnd" (solid): 16.5,40.5 20,40.5 20,35.5 16.5,35.5
GND on Top Solder "Vbatt-" (solid): 0,33.5 5,33.5 5,28.5 0,28.5
NetQ2_5-6 on Top Solder "Gnd" (solid): 22,33 27,33 27,28 22,28
VCC on Top Solder "V Batt+" (solid): 0,40.5 5,40.5 5,35.5 0,35.5
NetQ1_5 on Top Solder "Gnd" (solid): 22,40.5 27,40.5 27,35.5 22,35.5
NetQ2_5-6 on Top Layer "Gnd" (solid, pour order 25): 16.964,33 27,33 27,28 17,28
NetR8_3 on Top Layer "Gnd" (solid, pour order 28): 15.5,14 17,14 17,11.5 15.5,11.5 15.5,14 15,13.5 15,12 15.5,11.5
GND on Top Layer "Gnd" (solid, pour order 22): 0,33.5 7.5,33.5 7.5,25.5 5.5,25.5 2.5,28.5 0,28.5
NetQ2_1 on Top Layer "Gnd" (solid, pour order 24): 16,29.5 14.5,29.5 13.5,28.5 13.5,25.5 11.5,25.5 11.5,33.5 16,33.5
GND on Top Layer "Gnd" (solid, pour order 26): 1.5,19 8,19 8,12.5 6.75,12.5 6.5,11 3.5,11 3.25,12.5 1.5,12.5
NetQ1_5 on Top Layer "Vout+" (solid, pour order 20): 12,40.5 27,40.5 27,35.5 12,35.5
VCC on Top Layer "Vbatt+" (solid, remove dead copper, pour order 0): 0,35.5 5,35.5 6.5,37 10,37 10,40.5 5,40.5 0,40.5
GND on Bottom Layer "Gnd" (solid, pour order 12): -1.297,50.5 -1.297,-1 37.116,-1 37.116,50.5

## Silkscreen, mask and mechanical layers (free items; w line width, h text height)
Top Overlay:
  text "Batt+" at 0.5,41.015 h1.5
  text "R-Bank +" at 20.5,41.015 h1.5
  text "Batt-" at 0.5,34.015 h1.5
  text "R-Bank -" at 20.5,34.015 h1.5
  text "V-Adj" at 9.719,16 h1.5 r90
  text "I-Adj" at 9.719,10 h1.5 r90
Bottom Overlay:
  text "Li-po_Board" at 23.266,6.606 h1.12
  text "Rev.1 - Frk" at 22.766,2.234 h1.12
Mechanical 1:
  lines w0.254: 35.5,19 ccw(c31.5,19) 31.5,23 ; 35.5,19 35.5,4 cw(c31.5,4) 31.5,0 4,0 cw(c4,4) 0,4 0,45.5 cw(c4,45.5) 4,49.5 23,49.5 cw(c23,45.5) 27,45.5 27,27 ccw(c31,27) 31,23 31.5,23 ; 31.5,23 ccw(c31.5,23) 31.5,23